# Altium PCB ledcube_v2.PcbDoc (part 17 of 18)
Units mil, origin at the board's own origin, x right, y up, seen from the top; angles counter-clockwise.
Board outline 3130 x 3300 mil, 2 copper layers (Top Layer, Bottom Layer); 188 components, 216 nets, 29515 pads, 250 vias.
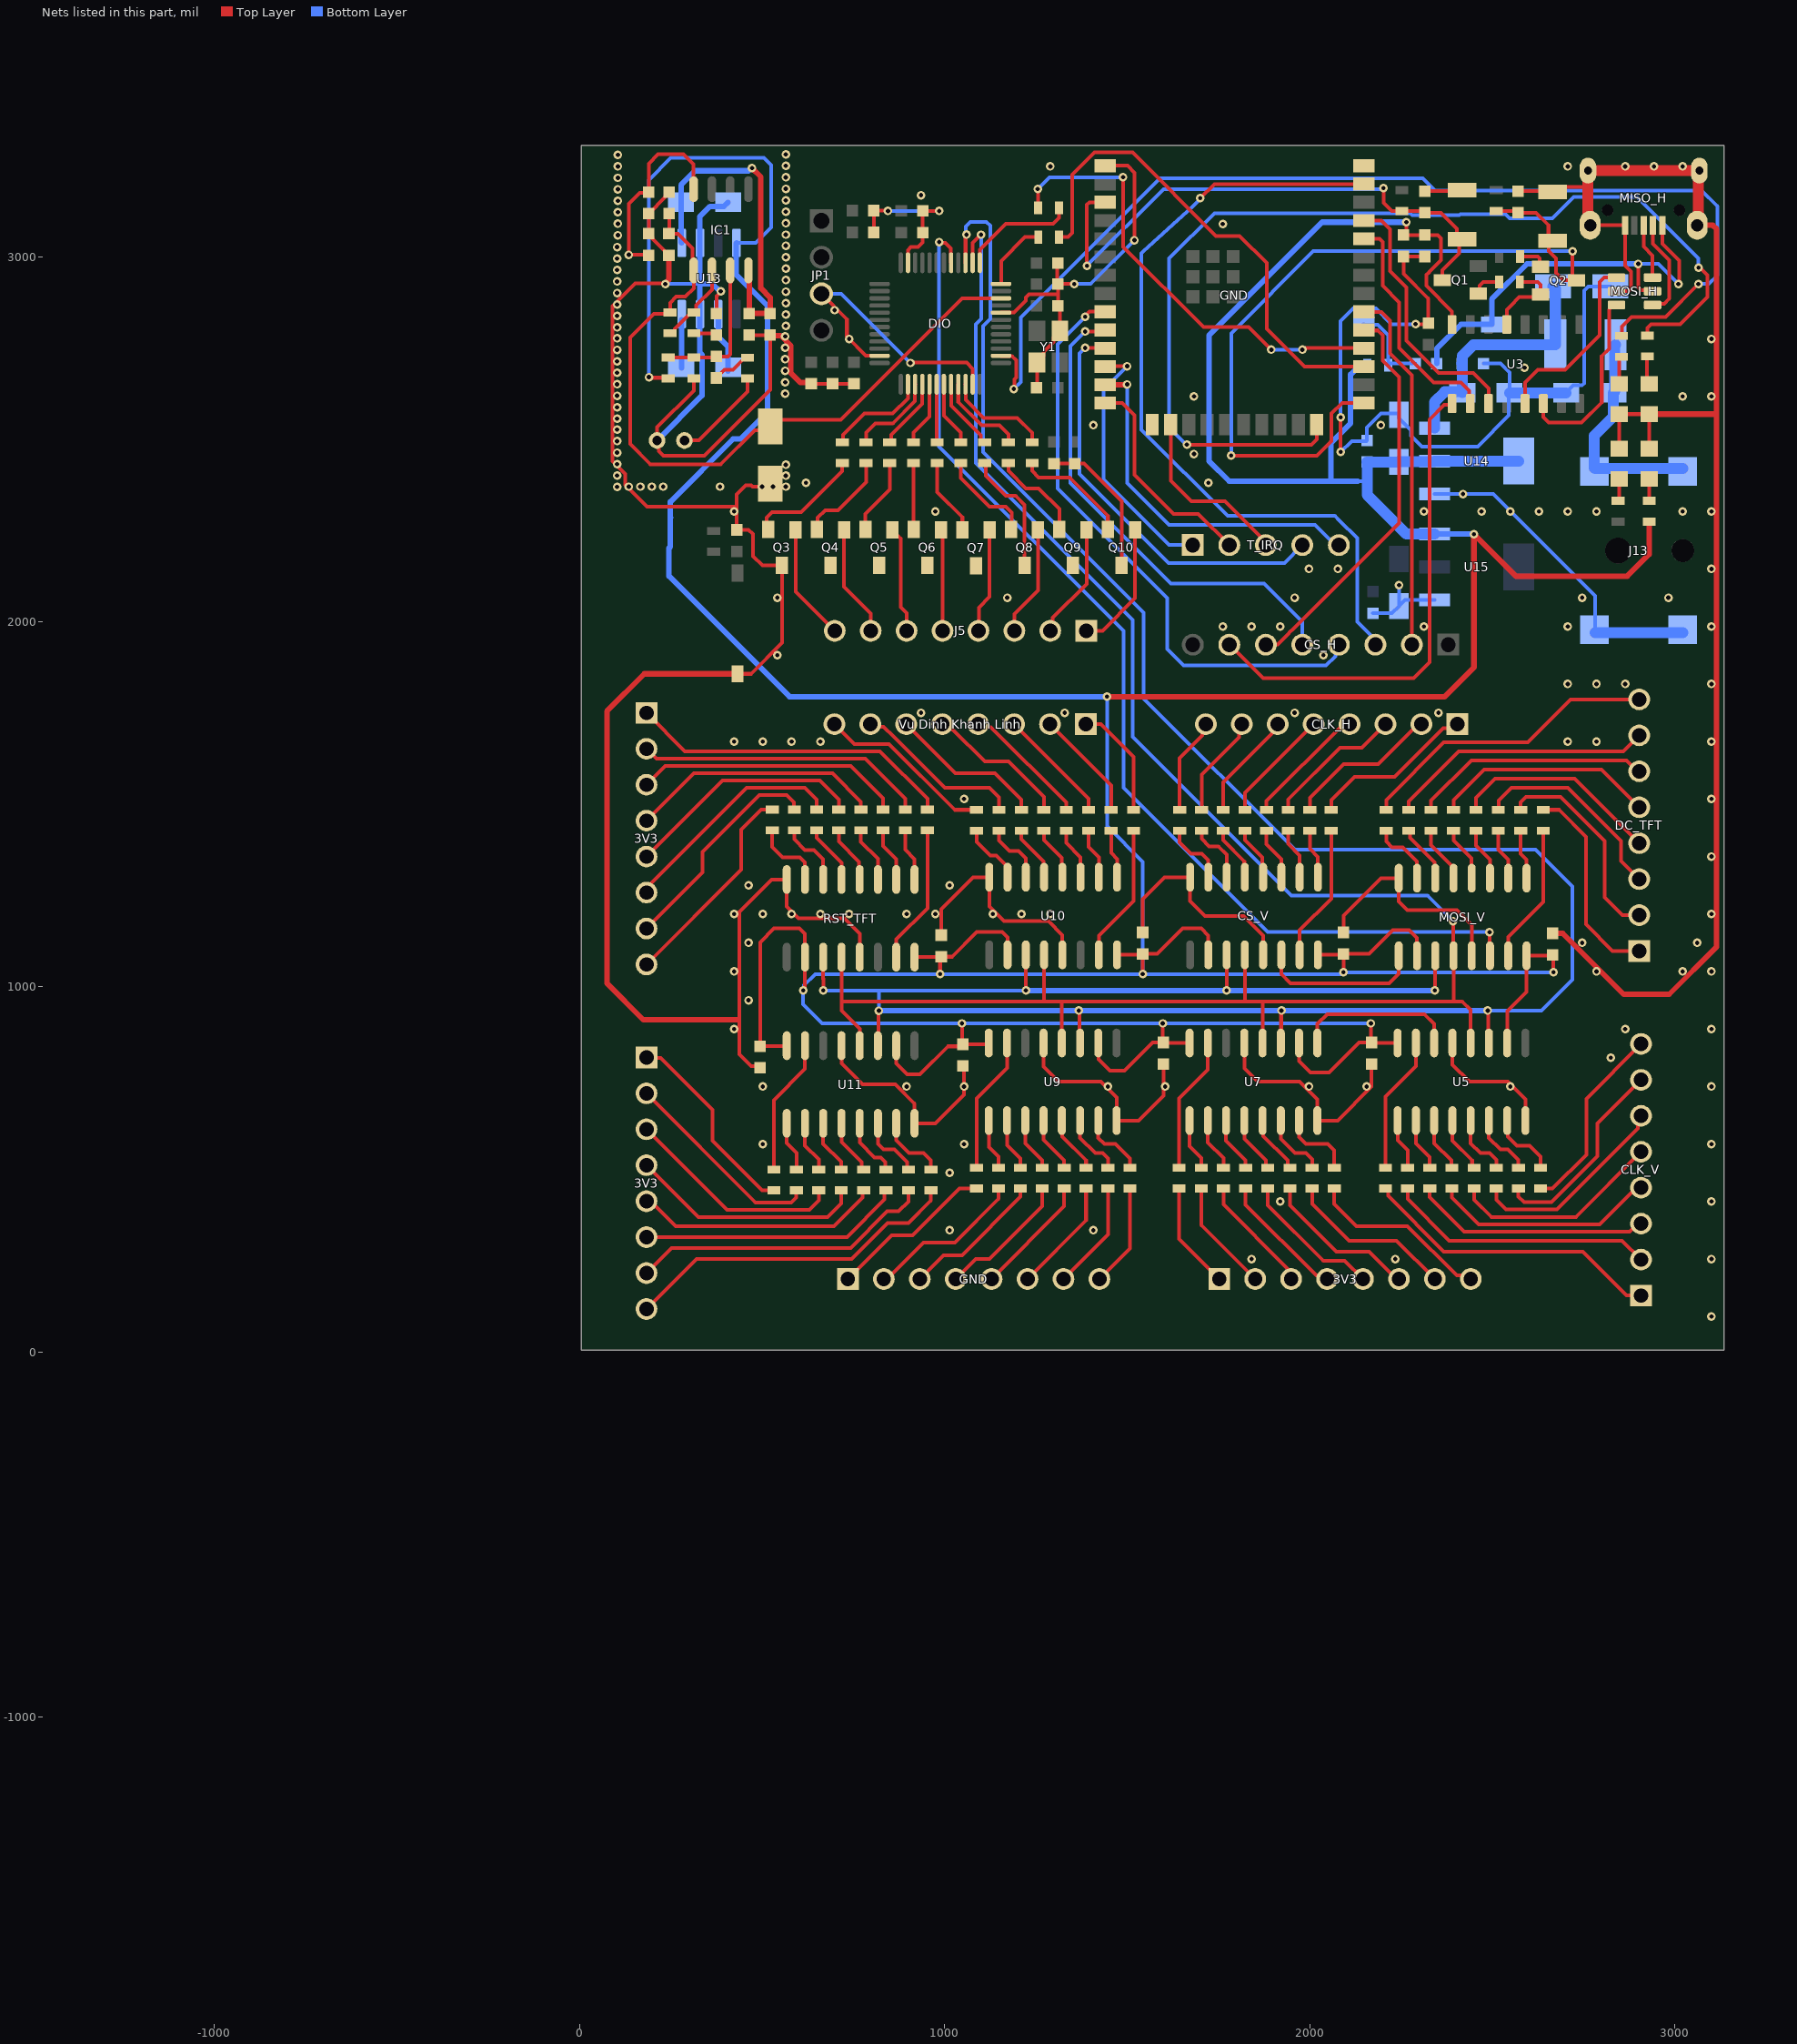
[diagram p16: the nets of this part, all layers, seen from the top]

## Via types
v1: diameter 23.62, hole 11.81, Top Layer to Bottom Layer, tented both sides, 128 vias
v2: diameter 23.62, hole 11.81, Top Layer to Bottom Layer, 122 vias

## Nets (pads, with @x,y where several pads share a name; then routed paths per layer and width w, separated by ;. In a path a pad name is that pad's centre, name@x,y a point inside that pad or via, vN(x,y) a via of type N, cw(c..) or ccw(c..) an arc to the next point about the centre after c; other vN are vias at no path point) (continued)
5V: C17.2 C18.2 C20.2 C21.2 C22.2 C23.2 C24.2 C25.2 C26.2 C27.2 C34.2 C35.2 C40.2 C42.2 CS_V.10 CS_V.16 IC1.8 MOSI_V.10 MOSI_V.16 R85.2 R88.2 R89.2 RST_TFT.10 RST_TFT.16 U3.16 U5.10 U5.16 U7.10 U7.16 U9.10 U9.16 U10.10 U10.16 U11.10 U11.16 U13.8 U14.2 U14.4 U15.3 | length 17330
  Top Layer w10: C35.2@189.72,3003.78 188.49,3005 v1(135,3005) 135,3145 164.83,3174.82 187.86,3174.82 C34.2@189.72,3176.68 189.72,3254.72 215,3280 285,3280 312.22,3252.78 312.22,3185.18 IC1.8@312.72,3184.69 ; v1(190,2670) 191.73,2668.27 241.26,2668.27 R85.2@242.98,2666.54 ; U11.16@567.56,839.21 566.11,837.76 C27.2@494.72,837.76 494.72,1122.23 532.72,1160.23 602.72,1160.23 617.56,1145.39 RST_TFT.10@617.56,1081.61 617.64,1081.53 v1@617.64,998.84 ; U11.10@867.56,839.21 867.56,790.39 897.72,760.23 932.72,760.23 1009.82,837.34 1044.3,837.34 C26.2@1049.72,842.76 ; RST_TFT.16@917.56,1081.61 C23.2@989.62,1081.61 ; v1(987.72,1035.23) 987.72,1079.7 C23.2@989.62,1081.61 ; v1@1047.72,890.23 1047.72,844.76 C26.2@1049.72,842.76 ; U9.16@1121.06,846.61 1117.21,842.76 C26.2@1049.72,842.76 ; U10.10@1172.56,1087.91 1172.56,1135.39 1157.72,1150.23 1087.72,1150.23 1020.19,1082.7 C23.2@990.72,1082.7 C23.2@989.62,1081.61 ; U9.10@1421.06,846.61 1421.23,846.44 1421.23,801.72 1452.72,770.23 1492.72,770.23 1570.24,847.76 C24.2@1599.72,847.76 ; U10.16@1472.56,1087.91 1540.4,1087.91 C22.2@1542.72,1090.23 ; v1(1542.72,1035.23) C22.2@1542.72,1090.23 ; v1@1597.72,890.23 1597.72,849.76 C24.2@1599.72,847.76 ; U7.16@1671.06,846.61 1600.86,846.61 C24.2@1599.72,847.76 ; CS_V.10@1722.56,1087.91 1722.56,1140.39 1702.72,1160.23 1652.72,1160.23 1582.72,1090.23 C22.2@1542.72,1090.23 ; U7.10@1971.06,846.61 1971.06,796.88 2002.72,765.23 2052.72,765.23 2135.24,847.76 C25.2@2169.72,847.76 2167.72,849.76 v1@2167.72,895.23 ; CS_V.16@2022.56,1087.91 2090.4,1087.91 C21.2@2092.72,1090.23 ; v1(2092.72,1040.23) C21.2@2092.72,1090.23 ; C25.2@2169.72,846.61 U5.16@2241.06,846.61 ; C18.2@2257,3059.29 C18.2@2267,3059.29 ; v1(2265,3094.26) 2265,3061.29 C18.2@2267,3059.29 ; MOSI_V.10@2294.05,1085.31 2294.05,1133.89 2272.72,1155.23 2227.54,1155.23 2162.54,1090.23 C21.2@2092.72,1090.23 ; U3.16@2390,2814.21 2390,2850 2320,2920 2320,2950 2327.01,2957.01 2327.01,2957.5 2334.55,2965.04 2335.04,2965.04 2360,2990 2360,3050 2350.71,3059.29 C17.2@2315.72,3059.29 C18.2@2267,3059.29 ; U5.10@2541.06,846.61 2541.06,933.58 2594.05,986.57 MOSI_V.16@2594.05,1085.31 2663.32,1085.31 C20.2@2665.72,1087.7 2667.72,1085.7 v1(2667.72,1040.23)
  Top Layer w15: v1(1445,1795) 2370,1795 2450,1875 v1(2450,2240) 2565,2125 2870,2125 2930,2185 R88.2@2930,2274.22
  Bottom Layer w10: v1(135,3005) 190,3005 ; v1(190,2670) 190,3005 ; U13.8@430,3037.44 482.44,3037.44 525,3080 525,3250 505,3270 250,3270 190,3210 190,3005 ; v1(1445,1795) 1445,1440.29 1542.72,1342.57 v1(1542.72,1035.23) ; 2131.37,2385 2157.75,2385 ; v1(2167.72,900.23) v1(1597.72,900.23) v1(1047.72,900.23) 664.77,900.23 612.72,952.28 v1(612.72,990.23) 615.32,992.84 615.32,1005.32 645.23,1035.23 v1(987.72,1035.23) v1(1542.72,1035.23) ; v1(2667.72,1040.23) v1(2092.72,1040.23) 2089.03,1040.23 2084.03,1035.23 v1(1542.72,1035.23)
  Bottom Layer w15: U13.8@430,3037.44 428.61,3036.05 428.61,2951.39 515,2865 515,2575 440.82,2500.82 420.82,2500.82 248.72,2328.72 248.72,2286.28 250,2285 248.72,2283.72 248.72,2205.05 245,2201.33 245,2125 575,1795 v1(1445,1795) ; 2131.37,2385 2057.82,2385 ; R89.2@2157.91,2702.55 2137.55,2702.55 2112.18,2677.19 2112.18,2543.51 2057.82,2489.14 2057.82,2385 ; v1(2265,3094.26) 2034.26,3094.26 1725,2785 1725,2439.42 1779.42,2385 2057.82,2385 ; U15.3@2341.84,2240.16 2341.92,2240.08 2449.92,2240.08 v1(2450,2240)
  Bottom Layer w30: U15.3@2341.84,2240.16 2264.84,2240.16 2157.75,2347.25 2157.75,2385 2157.75,2436.72 C42.2@2157,2437.47 2157.26,2437.74 2243.81,2437.74 C40.2@2244.08,2438 2245.08,2439 2340.84,2439 U14.2@2341.84,2440 U14.4@2572.55,2440
5V_USB: C43.1 MISO_H.1 MOSI_H.5 S2.1 | length 1151.5
  Top Layer w10: v1(2900,2980) 2900,2915.38 2907.42,2907.96 2936.45,2907.96 MOSI_H.5@2939.41,2905 ; MISO_H.1@2966.18,3085.83 2966.18,3034.67 3012.39,2988.45 3012.39,2927.39 v1(3010,2925)
  Bottom Layer w10: v1(2900,2980) 2955,2980 v1(3010,2925)
  Bottom Layer w15: C43.1@2348.26,2707.11 2348.26,2748.26 2414.42,2814.42 S2.1@2498.61,2814.42 2498.61,2883.61 2595,2980 v1(2900,2980)
9V: C39.2 C41.2 D4.2 F1.1 U14.3 | length 691.5
  Bottom Layer w30: U14.3@2341.84,2530.16 2341.84,2601.84 2370,2630 2415.53,2630 C39.2@2417.74,2627.79 ; C39.2@2418,2627.53 C39.2@2417.74,2627.79 ; D4.2@2666.26,2918.54 2673,2911.8 F1.1@2673,2758.54 2448.54,2758.54 2418.22,2728.22 2418.22,2707.86 C41.2@2417.47,2707.11 2417.74,2706.85 C39.2@2417.74,2627.79
-5V: C32.2 C33.2 C38.1 IC1.4 U13.5 | length 967.3
  Top Layer w15: IC1.4@462.72,2962.24 462.72,2936.29 464.98,2934.02 C33.2@464.98,2844.07 ; C33.2@465.98,2844.07 C32.2@522,2844.07 522,2888 496.65,2913.35 496.65,3218.13 472.5,3242.28 v1(472.5,3242.5)
  Bottom Layer w15: U13.5@280,3037.44 278,3039.44 C38.1@278,3149 278,3196.21 316.79,3235 462.67,3235 470.17,3242.5 v1(472.5,3242.5)
BOOT: DIO.44 R1.2 | length 199.7
  Top Layer w10: DIO.44@1017.85,2650.53 1017.85,2592.15 1099.12,2510.88 1099.12,2497.57 1104.95,2491.75 R1.2@1109.74,2491.75
DTR: Q2.2 R9.1 U3.13 | length 235.5
  Top Layer w10: U3.13@2540,2814.21 2540,2855 2550,2865 2574.28,2889.28 2624.89,2889.28 Q2.2@2632.05,2896.43 2632.05,2922.95 2624.77,2930.23 R9.1@2576.05,2930.23
GND: 3V3.2@2930,2473.83 5V.2 BOOT.OUT C1.1 C2.1 C3.1 C4.1 C5.1 C6.1 C7.1 C8.1 C9.1 C10.1 C11.1 C12.1 C13.1 C14.1 C15.1 C16.1 C17.1 C18.1 C19.2 C20.1 C21.1 C22.1 C23.1 C24.1 C25.1 C26.1 C27.1 C28.1 C29.1 C30.2 C32.1 C33.1 C34.1 C35.1 C36.1 C38.2 C39.1 C40.1 C41.1 C42.1 C44.1 C45.1 CLK.N CS_H.7 CS_V.8 CS_V.13 D3.1 D4.1 DIO.8 DIO.23 DIO.35 DIO.47 EN.OUT ESP32.2 GND.1@1439.84,3248.82 GND.15 GND.38 J13.2 J13.3 JP1.3 MISO_H.5 MISO_H.Shell MOSI_H.2 MOSI_V.8 MOSI_V.13 Q3.2 Q4.2 Q5.2 Q6.2 Q7.2 Q8.2 Q9.2 Q10.2 R1.1 R87.1 RESET.1 RST_TFT.8 RST_TFT.13 STM32.2 U3.1 U5.8 U5.13 U7.8 U7.13 U9.8 U9.13 U10.8 U10.13 U11.8 U11.13 U13.3 U13.6 U14.1 U15.1 Y1.2 Y1.4 | length 22885
  Top Layer w10: C35.1@189.72,3062.83 C34.1@189.72,3117.63 234.97,3162.88 234.97,3166.01 C29.1@245.72,3176.76 ; C35.1@190.54,3062.83 200.46,3052.91 200.46,3048.78 233.97,3015.28 233.97,3014.45 C28.1@243.89,3004.53 ; v1(235,2925) 232.67,2927.33 152.33,2927.33 90,2865 90,2440 125,2405 125,2375 132.5,2367.5 185,2315 430.72,2315 ; R87.1@312.98,2661.54 312.98,2632.98 212.6,2532.6 CLK.N@212.6,2496.5 217.28,2491.82 217.28,2467.72 230.08,2454.92 341.67,2454.92 522,2635.26 C32.1@522,2785.02 C33.1@464.98,2785.02 C33.1@459.98,2785.02 ; C30.2@374.98,2844.07 374.98,2892.02 386.86,2903.89 v1(386.86,2904.68) ; RESET.1@432.72,1857.44 469.92,1857.44 554.74,1942.26 Q3.2@554.74,2153.99 501.01,2153.99 475,2180 475,2240 463.24,2251.76 C3.1@430.72,2251.76 430.72,2315 ; C27.1@494.72,778.7 490.3,783.12 469.83,783.12 437.72,815.23 437.72,1205.23 526.7,1294.21 RST_TFT.8@567.56,1294.21 567.56,1220.39 600.03,1187.91 725.03,1187.91 767.56,1145.39 RST_TFT.13@767.56,1081.61 ; v1(530,2370) 474.16,2370 470.79,2373.38 455.86,2373.38 430.72,2348.23 430.72,2315 ; C10.1@634.74,2651.68 C12.1@693.24,2651.68 C11.1@751.74,2651.68 ; JP1.3@662.68,2898.2 732.38,2828.51 732.38,2780.57 784.32,2728.63 821.64,2728.63 DIO.35@821.99,2728.28 ; U11.13@717.56,839.21 717.56,790.39 775.03,732.91 865.03,732.91 917.56,680.39 U11.8@917.56,626.61 974.1,626.61 1052.72,705.23 C26.1@1052.72,787.91 ; C13.1@806.27,3066.2 C14.1@806.27,3126.2 806.78,3125.7 844.3,3125.7 v1(845,3125) ; DIO.23@899.74,2983.2 899.74,3018.2 907.56,3026.02 927.56,3026.02 940.33,3038.79 C4.1@940.33,3065.2 C5.1@940.33,3125.2 940.53,3125 v1(985,3125) ; v1(906.25,2708.75) 907.5,2710 1060,2710 1076.91,2693.09 DIO.47@1076.91,2650.53 ; Q6.2@953.31,2153.99 Q6.2@960,2147.3 ; C23.1@990.72,1141.76 990.72,1213.23 1077.99,1300.51 U10.8@1122.56,1300.51 1122.56,1220.39 1162.72,1180.23 1284.61,1180.23 1322.56,1142.28 U10.13@1322.56,1087.91 ; R1.1@1109.74,2434.66 1113.26,2431.15 1113.26,2399.69 1167.72,2345.23 1194.48,2345.23 1219.03,2320.68 Q8.2@1219.03,2153.99 ; DIO.8@1154.66,2846.39 1155.01,2846.74 1190.11,2846.74 1222.88,2879.51 1222.88,2887.88 1231.58,2896.58 1310.56,2896.58 ; C1.1@1251.43,2641.2 1253.25,2643.02 Y1.4@1253.25,2709.9 1270.88,2727.53 1270.88,2736.48 1272.72,2738.31 1272.72,2740.23 1298.6,2766.12 1298.6,2778.87 Y1.2@1316.24,2796.51 1316.24,2859.52 C2.1@1310.56,2865.2 1310.56,2896.58 ; U9.13@1271.06,846.61 1271.06,781.88 1312.63,740.31 1427.63,740.31 1471.06,696.88 U9.8@1471.06,634.01 1531.5,634.01 1599.72,702.23 C24.1@1599.72,788.7 ; C9.1@1299.74,2433.2 C8.1@1356.74,2433.2 1381.8,2433.2 1484.74,2330.26 Q10.2@1484.74,2153.99 ; C7.1@1308.89,2923.53 1308.89,2980.53 C6.1@1310.56,2982.2 ; C7.1@1310.56,2925.2 1310.56,2896.58 ; C7.1@1310.76,2925 v1(1355,2925) ; GND.1@1439.84,3248.82 1501.09,3248.82 1520,3229.91 v1(1520,3045) ; C22.1@1542.72,1149.29 1542.72,1240.23 1602.99,1300.51 CS_V.8@1672.56,1300.51 1672.56,1235.39 1713.74,1194.21 1818.74,1194.21 1872.56,1140.39 CS_V.13@1872.56,1087.91 ; CS_H.7@1780,1932.05 CS_H.7@1780,1937.3 1872.3,1845 2285,1845 2328.7,1888.7 2328.7,2553.7 2368.65,2593.65 2385.98,2593.65 U3.1@2390,2597.68 ; U7.13@1821.06,846.61 1821.06,776.88 1857.63,740.31 1972.63,740.31 2021.06,691.88 U7.8@2021.06,634.01 2076.5,634.01 2169.72,727.23 C25.1@2169.72,788.7 ; v1(2085,2465) v1(2085,2560) ; C21.1@2092.72,1149.29 2092.72,1195.23 2195.4,1297.91 MOSI_V.8@2244.05,1297.91 2244.05,1233.89 2268.03,1209.92 2402.94,1209.92 2444.05,1168.8 MOSI_V.13@2444.05,1085.31 ; v1(2290,2815) 2323.19,2815 C19.2@2325.72,2817.53 2325,2818.24 2325,2885 2257,2953 C18.1@2257,3000.23 C17.1@2315.72,3000.23 C17.1@2315.21,2999.72 ; C15.1@2325.72,3179.05 2415,3179.05 EN.OUT@2417.72,3181.76 ; U5.13@2391.06,846.61 2391.06,786.88 2437.63,740.31 2542.63,740.31 2591.06,691.88 U5.8@2591.06,634.01 ; C16.1@2570.72,3179.05 2660.97,3179.05 2672.35,3190.43 2762.44,3190.43 ; MISO_H.Shell@2765.36,3085.83 MISO_H.Shell@2768.35,3085.83 MISO_H.5@2863.82,3085.83 2863.82,2975.19 2880,2959.01 2880,2912.57 2873.55,2906.12 2841.71,2906.12 MOSI_H.2@2840.59,2905 ; 5V.2@2847.5,2473.83 STM32.2@2847.5,2568.66 ESP32.2@2930,2568.66 3V3.2@2930,2473.83
  Top Layer w15: v1(235,2925) 235,2927.33 244.72,2937.05 C28.1@244.72,3003.7 ; 430,910 175,910 75,1010 75,1755 177.44,1857.44 RESET.1@432.72,1857.44 ; C32.1@522,2785.02 523.48,2783.54 551.46,2783.54 578.37,2756.63 578.37,2681.63 605.28,2654.72 631.7,2654.72 C10.1@634.74,2651.68 ; C20.1@2665.72,1146.76 2693.24,1146.76 2860,980 2985,980 3114.63,1109.63 3114.63,2568.66 ; ESP32.2@2930,2568.66 3114.63,2568.66 ; MISO_H.Shell@3061.65,3085.83 3104.17,3085.83 3114.63,3075.37 3114.63,2568.66
  Top Layer w30: MISO_H.Shell@2768.35,3085.83 2763.16,3091.01 2763.16,3120.99 2762.44,3121.71 2762.44,3190.43 MISO_H.Shell@2762.44,3235.43 MISO_H.Shell@3067.56,3235.43 3064.64,3232.51 3064.64,3088.81 MISO_H.Shell@3061.65,3085.83
  Bottom Layer w10: v1(235,2925) 330,2925 ; JP1.3@662.68,2898.2 716.8,2898.2 v1(906.25,2708.75) ; v1(845,3125) v1(985,3125) ; v1(1355,2925) 1400,2925 v1(1520,3045) ; v1(2085,2465) 2115,2495 2155.47,2495 C42.1@2157,2496.53 2157,2532 2195,2570 2241.08,2570 C40.1@2244.08,2567 2244.08,2558 2277.13,2524.95 2277.13,2509.67 2306.79,2480 2460,2480 2545,2565 2545,2625.53 C39.1@2547,2627.53 ; v1(2085,2560) 2085,2823.21 2119.67,2857.87 2181.55,2857.87 2224.43,2815 v1(2290,2815) ; C45.1@2173.49,2023.47 2225.35,2023.47 C44.1@2244.88,2043 C44.1@2245,2043.12 ; v1(2245,2100) C44.1@2245,2043.12 ; U15.1@2341.84,2059.84 2261.72,2059.84 C44.1@2245,2043.12 ; U14.1@2341.84,2349.84 2342,2350 v1(2420,2350) 2503.21,2350 2782.01,2071.2 2782.01,1971.18 J13.3@2782.01,1970.59 ; C41.1@2476.53,2707.11 2522.89,2707.11 2547.4,2682.6 C39.1@2547.4,2627.53 ; C36.1@2702.6,2627.13 2722.65,2647.17 2746.27,2647.17 2752.13,2653.03 2752.13,2907.13 2763.54,2918.54 D4.1@2823.74,2918.54
  Bottom Layer w15: CLK.N@212.6,2496.5 335.37,2619.27 335.37,2731.37 330,2736.74 U13.3@330,2842.56 330,2925 ; v1(386.86,2904.68) 384.53,2904.68 364.21,2925 330,2925 ; C38.2@407,3149 395.54,3137.54 357.54,3137.54 330,3110 U13.6@330,3037.44 330,2925
  Bottom Layer w30: C39.1@2547.4,2627.13 C36.1@2702.6,2627.13 ; J13.3@2782.01,1970.59 J13.2@3022.17,1970.59
  other v1: 102.83,2369.04 135,2370 166.43,2370 197.86,2370 229.29,2370 385,2370 500,2370 565,2370 102.83,2400.47 565,2400 565,2430 102.83,2431.9 102.83,2463.33 102.83,2494.76 102.83,2526.18 102.83,2556.18 102.83,2587.61 102.83,2619.04 563.37,2624.49 102.83,2650.47 563.37,2655.91 102.83,2681.9 563.37,2687.34 102.83,2713.33 563.37,2718.77 102.83,2744.76 563.37,2750.2 102.83,2776.18 563.37,2781.63 102.83,2806.18 565,2810 102.83,2837.61 565,2841.43 102.83,2869.04 565,2872.86 102.83,2900.47 565,2904.29 102.83,2931.9 565,2935.71 102.83,2963.33 565,2967.14 102.83,2994.76 565,2998.57 102.83,3026.18 565,3030 105,3058.57 565,3060 105,3090 565,3091.43 105,3121.43 565,3122.86 105,3152.86 565,3154.29 105,3184.29 565,3185.71 105,3215.71 565,3217.14 105,3247.14 565,3248.57 105,3278.57 565,3280
  other v2: 3100.65,97.37 1840.81,254.85 2234.51,254.85 3100.65,254.85 1014.03,333.59 1407.74,333.59 1919.55,412.33 3100.65,412.33 1014.03,491.07 502.22,569.81 1053.4,569.81 3100.65,569.81 502.22,727.29 895.92,727.29 1053.4,727.29 1447.11,727.29 1604.59,727.29 1998.29,727.29 2155.77,727.29 2549.47,727.29 3100.65,727.29 2825.06,806.03 423.48,884.77 2864.43,884.77 3100.65,884.77 462.85,963.51 423.48,1042.25 2785.69,1042.25 3021.91,1042.25 3100.65,1042.25 462.85,1120.99 2746.32,1120.99 3061.28,1120.99 423.48,1199.73 502.22,1199.73 580.96,1199.73 659.7,1199.73 738.44,1199.73 895.92,1199.73 974.66,1199.73 1132.14,1199.73 1210.88,1199.73 1289.62,1199.73 3100.65,1199.73 462.85,1278.47 1014.03,1278.47 3100.65,1357.21 1053.4,1514.69 3100.65,1514.69 423.48,1672.17 502.22,1672.17 580.96,1672.17 659.7,1672.17 2706.95,1672.17 2785.69,1672.17 3100.65,1672.17 935.29,1750.91 1328.99,1750.91 1958.92,1750.91 2352.62,1750.91 2706.95,1829.65 2785.69,1829.65 2864.43,1829.65 3100.65,1829.65 541.59,1908.39 2037.66,1908.39 1762.07,1987.13 1840.81,1987.13 1919.55,1987.13 2313.25,1987.13 2706.95,1987.13 3100.65,1987.13 541.59,2065.87 1171.51,2065.87 1958.92,2065.87 2746.32,2065.87 2982.54,2065.87 1998.29,2144.61 2077.03,2144.61 3100.65,2144.61 423.48,2302.09 974.66,2302.09 2313.25,2302.09 2470.73,2302.09 2549.47,2302.09 2628.21,2302.09 2706.95,2302.09 2785.69,2302.09 3021.91,2302.09 3100.65,2302.09 620.33,2380.83 1722.7,2380.83 1683.33,2459.57 1407.74,2538.31 2195.14,2538.31 1683.33,2617.05 3021.91,2617.05 3100.65,2617.05 2588.84,2695.79 738.44,2774.53 3100.65,2774.53 699.07,2853.27 1762.07,3089.49 935.29,3168.23 1289.62,3246.97 2706.95,3246.97 2864.43,3246.97 2943.17,3246.97 3021.91,3246.97
LED_STATUS: GND.24 R4.1 | length 2855.9
  Top Layer w10: v1@1663.86,2485 2005,2485 2019.58,2499.58 GND.24@2019.58,2520.6 ; R4.1@2925,2783.54 2925,2805 2935,2815 3014.9,2815 3089.56,2889.66 3089.56,2948.57 3068.13,2970 v1(3065,2970)
  Bottom Layer w10: v1(1663.55,2485) 1662.07,2485 1615,2532.07 1615,2995 1739.07,3119.07 2275.28,3119.07 2281.07,3113.28 2410.09,3113.28 2413.18,3116.38 2536.85,3116.38 2548.23,3105 2665,3105 2723.35,3163.35 2896.65,3163.35 2978.9,3081.1 3065,2995 v1(3065,2970)
LEDTEST_STM32: DIO.2 R3.1 | length 2966
  Top Layer w10: DIO.2@1154.66,2728.28 1155.01,2727.94 1184.52,2727.94 1196.08,2716.38 1196.08,2669.42 1191.08,2664.42 1191.08,2639.34 v1(1189.35,2637.6) ; R3.1@2854.44,2782.62 2855,2783.18 2855,2808.45 2881.55,2835 2975,2835 3064.87,2924.87 v1(3064.87,2925)
  Bottom Layer w10: v1(1189.35,2637.6) 1208.37,2656.62 1208.37,2833.37 1590,3215 2310,3215 2343.78,3181.22 3073.78,3181.22 3117.13,3137.87 3117.13,2948.54 3093.59,2925 v1(3064.87,2925)
NetB1_IN: C15.2 EN.IN GND.3@1439.84,3148.82 Q1.3 R7.1 | length 1555.2
  Top Layer w10: v1(1390,2975) 1390,3142.46 1396.36,3148.82 GND.3@1439.84,3148.82 ; v1(2202.39,3187.39) 2202.39,3147.61 2225.1,3124.9 R7.1@2252.72,3124.9 ; R7.1@2257.62,3124.9 2310.81,3124.9 C15.2@2315.72,3119.99 2360.01,3119.99 2403.27,3076.73 2403.27,3062.34 EN.IN@2417.72,3047.9 2410,3040.19 2410,3009.54 2363.5,2963.04 Q1.3@2363.5,2935.43
  Bottom Layer w10: v1(1390,2975) 1600,3185 2192.33,3185 2194.72,3187.39 v1(2202.39,3187.39)
NetB2_IN: BOOT.IN C16.2 GND.25 Q2.3 R8.1 | length 2303.2
  Top Layer w10: v1(1785,2455) 2020,2455 2060,2495 2060,2569.91 2088.91,2598.82 GND.25@2168.27,2598.82 ; R8.1@2511.07,3124.9 2565.81,3124.9 C16.2@2570.72,3119.99 2620.01,3119.99 2654.26,3085.74 2654.26,3056.6 BOOT.IN@2662.96,3047.9 ; BOOT.IN@2663.68,3047.9 2655,3039.22 2655,3015 2675,2995 2675,2955 2694.97,2935.03 Q2.3@2730.47,2935.03 2720,2945.5 v1(2720,3014.69)
  Bottom Layer w10: v1(1785,2455) 1785,2790 2009.68,3014.69 v1(2720,3014.69)
NetC28_2: C28.2 C29.2 D3.2 DIO.10 IC1.1 R83.2 | length 2012.5
  Top Layer w10: C29.2@245.72,3117.7 245.72,3063.76 C28.2@244.72,3062.76 270.19,3062.76 310.11,3022.84 310.11,2964.85 IC1.1@312.72,2962.24 312.72,2912.72 290.09,2890.09 265.16,2890.09 247.98,2872.91 R83.2@247.98,2847.09 244.61,2843.71 203.71,2843.71 138.38,2778.38 138.38,2486.62 193.38,2431.62 386.62,2431.62 480.02,2525.02 512.65,2525.02 540.31,2552.68 715.27,2552.68 1048.35,2885.76 DIO.10@1154.66,2885.76
NetC30_1: C30.1 R84.1 | length 64.1
  Top Layer w10: R84.1@312.98,2790 370,2790 C30.1@374.98,2785.02
NetC31_1: C31.1 IC1.3 R85.1 R87.2 | length 438.7
  Top Layer w10: R85.1@242.98,2723.5 C31.1@374.98,2723.5 ; C31.1@374.98,2726.61 407.13,2726.61 412.98,2732.47 IC1.3@412.98,2927.99 ; IC1.3@412.72,2927.72 IC1.3@412.98,2927.99 ; IC1.3@412.72,2962.24 IC1.3@412.98,2961.98 ; IC1.3@412.98,2962.24 IC1.3@412.98,2961.98 ; IC1.3@412.98,2927.99 415.11,2930.11 415.11,2959.85 IC1.3@412.98,2961.98 ; IC1.3@412.98,2927.99 IC1.3@412.98,2961.98
NetC31_2: C31.2 R86.2 | length 108.4
  Top Layer w10: C31.2@374.98,2667.56 397.28,2689.86 419.84,2689.86 R86.2@453.38,2723.4 ; R86.2@453.38,2718.4 R86.2@460.27,2718.4
NetC36_2: C36.2 F1.0 J13.1 | length 604.3
  Bottom Layer w30: F1.0@2838.41,2758.54 2835.2,2755.33 2835.2,2629.93 C36.2@2832,2626.73 2832,2562 2780,2510 2780,2421.42 2782.01,2419.41 J13.1@3022.17,2419.41
NetC37_1: C37.1 U13.4 | length 131
  Bottom Layer w15: C37.1@280,2695.47 U13.4@280,2826.51
NetC37_2: C37.2 U13.2 | length 167.4
  Bottom Layer w15: U13.2@380,2842.56 380,2780 407.27,2752.73 C37.2@407.27,2697.17 C37.2@407.27,2686.44
NetC43_2: C43.2 R89.1 S2.2 | length 232.9
  Bottom Layer w10: S2.2@2148.22,2814.42 2149.53,2813.11 2186.89,2813.11 2215,2785 R89.1@2215,2707.11 ; R89.1@2215,2702.55 2219.56,2707.11 C43.2@2289.2,2707.11
NetD1_1: R3.2 STM32.1 | length 77.7
  Top Layer w10: STM32.1@2847.5,2651.34 2847.5,2719.71 2853.33,2725.53 R3.2@2854.44,2725.53
NetD2_1: ESP32.1 R4.2 | length 77.5
  Top Layer w10: R4.2@2924.17,2726.46 2924.17,2657.17 ESP32.1@2930,2651.34
NetD5_1: 3V3.1@2930,2391.15 R88.1 | length 59.8
  Top Layer w10: R88.1@2930,2331.31 3V3.1@2930,2391.15
NetD6_1: 5V.1 R90.1 | length 64.4
  Top Layer w10: R90.1@2845,2331.31 2847.5,2333.81 5V.1@2847.5,2391.15
  Top Layer w15: 5V.1@2845,2388.65 5V.1@2847.5,2391.15
NetIC1_2: IC1.2 R83.1 R84.2 | length 228.5
  Top Layer w10: R83.1@247.98,2790 254.87,2790 260.7,2795.83 260.7,2801.69 306.09,2847.09 314.13,2847.09 319.95,2852.91 319.95,2867.06 362.72,2909.82 IC1.2@362.72,2962.24
NetJ1_2: MISO_H.2 MOSI_H.4 | length 272
  Top Layer w10: MOSI_H.4@2939.41,2867.6 2942.79,2870.98 2970.98,2870.98 2985,2885 2985,2990.57 2940.59,3034.98 MISO_H.2@2940.59,3085.83
NetJ1_3: MISO_H.3 MOSI_H.6 | length 153.5
  Top Layer w10: MISO_H.3@2915,3085.83 2915,3027.44 2939.41,3003.03 MOSI_H.6@2939.41,2942.4
NetJ2_2: CS_H.2 GND.30 | length 993.9
  Top Layer w10: GND.30@2148.5,2848.82 2196.18,2848.82 2220,2825 2220,2735 2280,2675 CS_H.2@2280,1937.3
NetJ2_3: CS_H.3 GND.37 | length 2215.1
  Top Layer w10: v1(1700,3160) 1738.82,3198.82 GND.37@2168.27,3198.82
  Bottom Layer w10: v1(1700,3160) 1700,3157.33 1684.99,3142.32 1678.56,3136.46 1545.07,3015.07 1539.21,3009.21 1539.21,3005.06 1539.21,2525.79 1775,2290 2068.87,2290 2082.14,2276.74 2130,2228.87 2130,2000 2180,1950 CS_H.3@2180,1937.3
NetJ2_4: CS_H.4 GND.9 | length 1653.5
  Top Layer w10: v1(1385,2835) 1385,2837.85 1397.15,2850 GND.9@1439.84,2850
  Bottom Layer w10: v1(1385,2835) 1384.91,2835 1310,2760.09 1310,2365 1610,2065 1610,1925 1655,1880 2045,1880 2070.46,1905.46 2070.46,1927.76 CS_H.4@2080,1937.3
NetJ2_5: CS_H.5 GND.10 | length 1342.5
  Top Layer w10: v1@1385.6,2795 1436.02,2795 GND.10@1439.84,2798.82
  Bottom Layer w10: v1(1385,2795) 1345,2755 1345,2380 1620,2105 1875,2105 1980,2000 CS_H.5@1980,1937.3
NetJ2_6: CS_H.6 GND.29 | length 1098.3
  Top Layer w10: CS_H.6@1880,1937.3 1912.3,1937.3 1939.82,1964.82 cw(c1980,1937.3) 1952.47,1977.47 2245,2270 2245,2670 2200,2715 2200,2785 2187.17,2797.83 2144.96,2797.83 GND.29@2143.97,2798.82
NetJ3_1: CLK_V.1 R12.2 | length 829.8
  Top Layer w10: R12.2@2207.56,447.91 2209.02,447.91 2214.85,442.09 2214.85,427.94 2367.56,275.23 2747.72,275.23 2867.97,154.98 CLK_V.1@2907.72,154.98
NetJ3_2: CLK_V.2 R14.2 | length 736.6
  Top Layer w10: R14.2@2268.27,447.91 2268.27,419.67 2382.72,305.23 2855.88,305.23 CLK_V.2@2907.72,253.4
NetJ3_3: CLK_V.3 R16.2 | length 650.4
  Top Layer w10: R16.2@2328.99,447.91 2328.99,423.96 2422.72,330.23 2877.17,330.23 2898.77,351.83 CLK_V.3@2907.72,351.83
NetJ3_4: CLK_V.4 R18.2 | length 614.4
  Top Layer w10: R18.2@2389.7,447.91 2389.7,423.25 2462.72,350.23 2794.83,350.23 2894.85,450.25 CLK_V.4@2907.72,450.25
NetJ3_5: CLK_V.5 R20.2 | length 581.2
  Top Layer w10: R20.2@2450.41,447.91 2450.41,417.53 2497.72,370.23 2729.27,370.23 CLK_V.5@2907.72,548.68
NetJ3_6: CLK_V.6 R22.2 | length 560.8
  Top Layer w10: R22.2@2511.13,447.91 2511.13,416.82 2537.72,390.23 2677.72,390.23 2899.55,612.07 2899.55,638.94 CLK_V.6@2907.72,647.1
NetJ3_7: CLK_V.7 R24.2 | length 556
  Top Layer w10: R24.2@2571.84,447.91 2571.84,426.1 2587.72,410.23 2662.72,410.23 2788.77,536.29 2788.77,626.58 CLK_V.7@2907.72,745.53
NetJ3_8: CLK_V.8 R26.2 | length 529.3
  Top Layer w10: R26.2@2632.56,447.91 2665.4,447.91 2757.72,540.23 2757.72,693.95 CLK_V.8@2907.72,843.95
NetJ4_1: DC_TFT.1 R13.2 | length 563.7
  Top Layer w10: R13.2@2639.7,1485 2682.95,1485 2756.72,1411.22 2756.72,1171.22 2829.55,1098.4 DC_TFT.1@2902.72,1098.4
NetJ4_2: DC_TFT.2 R15.2 | length 576
  Top Layer w10: R15.2@2578.27,1485 2578.27,1505.79 2592.72,1520.23 2687.72,1520.23 2807.72,1400.23 2807.72,1245.23 2856.12,1196.83 DC_TFT.2@2902.72,1196.83
NetJ4_3: DC_TFT.3 R17.2 | length 560.8
  Top Layer w10: R17.2@2516.84,1485 2517.45,1485.61 2517.45,1509.97 2552.72,1545.23 2707.72,1545.23 2852.73,1400.21 2852.73,1345.23 DC_TFT.3@2902.72,1295.25
NetJ4_4: DC_TFT.4 R19.2 | length 575
  Top Layer w10: R19.2@2455.41,1485 2455.41,1517.93 2507.72,1570.23 2726.16,1570.23 DC_TFT.4@2902.72,1393.68
NetJ4_5: DC_TFT.5 R21.2 | length 612.6
  Top Layer w10: R21.2@2393.99,1485 2393.99,1511.5 2477.72,1595.23 2799.59,1595.23 DC_TFT.5@2902.72,1492.1
NetJ4_6: DC_TFT.6 R23.2 | length 653.2
  Top Layer w10: R23.2@2332.56,1485 2332.56,1510.07 2442.72,1620.23 2867.51,1620.23 2897.21,1590.53 DC_TFT.6@2902.72,1590.53
NetJ4_7: DC_TFT.7 R25.2 | length 729.9
  Top Layer w10: R25.2@2271.13,1485 2271.13,1508.65 2407.72,1645.23 2858.99,1645.23 DC_TFT.7@2902.72,1688.95
NetJ4_8: DC_TFT.8 R27.2 | length 834.2
  Top Layer w10: R27.2@2209.7,1485 2209.7,1512.22 2367.72,1670.23 2597.72,1670.23 2714.86,1787.38 DC_TFT.8@2902.72,1787.38
NetJ5_1: J5.1 Q10.1 | length 358.6
  Top Layer w10: J5.1@1387.99,1975.23 1432.72,1975.23 1521.74,2064.26 Q10.1@1521.74,2252.2
NetJ5_2: J5.2 Q9.1 | length 318.1
  Top Layer w10: J5.2@1289.57,1975.23 1296.5,1982.16 1296.5,2011.5 1388.89,2103.89 Q9.1@1388.89,2252.2
NetJ5_3: J5.3 Q8.1 | length 303.8
  Top Layer w10: J5.3@1191.14,1975.23 1191.14,2021.14 1256.03,2086.03 Q8.1@1256.03,2252.2
NetJ5_4: J5.4 Q7.1 | length 288.8
  Top Layer w10: J5.4@1092.72,1975.23 1094.06,1976.57 1094.06,2039.06 1123.17,2068.17 Q7.1@1123.17,2251.42
NetJ5_5: J5.5 Q6.1 | length 278.6
  Top Layer w10: Q6.1@990.31,2252.2 994.29,2248.23 J5.5@994.29,1975.23
NetJ5_6: J5.6 Q5.1 | length 295.8
  Top Layer w10: Q5.1@857.46,2252.2 857.46,2245.31 869.19,2233.58 874.14,2233.58 880,2227.72 880,2040 895.86,2024.14 J5.6@895.86,1975.23
NetJ5_7: J5.7 Q4.1 | length 307.1
  Top Layer w10: Q4.1@724.6,2252.2 724.6,2095.4 797.44,2022.56 J5.7@797.44,1975.23
NetJ5_8: J5.8 Q3.1 | length 321.4
  Top Layer w10: Q3.1@591.74,2252.2 591.74,2082.5 J5.8@699.01,1975.23
NetJ6_1: 3V3.1@1752.46,200.23 R29.2 | length 293.2
  Top Layer w10: R29.2@1642.56,447.91 1642.56,310.13 3V3.1@1752.46,200.23
NetJ6_2: 3V3.2@1850.88,200.23 R32.2 | length 308.8
  Top Layer w10: R32.2@1703.27,447.91 1703.27,347.84 3V3.2@1850.88,200.23
NetJ6_3: 3V3.3@1949.31,200.23 R34.2 | length 324.4
  Top Layer w10: R34.2@1763.99,447.91 1763.99,403.96 1939.86,228.08 1939.86,209.68 3V3.3@1949.31,200.23
NetJ6_4: 3V3.4@2047.73,200.23 R36.2 | length 351.8
  Top Layer w10: R36.2@1824.7,447.91 1824.7,403.25 2018.27,209.68 2038.29,209.68 3V3.4@2047.73,200.23
NetJ6_5: 3V3.5@2146.16,200.23 R38.2 | length 389.9
  Top Layer w10: R38.2@1885.41,447.91 1885.41,402.53 2037.72,250.23 2096.16,250.23 3V3.5@2146.16,200.23
NetJ6_6: 3V3.6@2244.59,200.23 R40.2 | length 428.1
  Top Layer w10: R40.2@1946.13,447.91 1946.13,401.82 2072.72,275.23 2162.37,275.23 2237.37,200.23 3V3.6@2244.59,200.23
NetJ6_7: 3V3.7@2343.01,200.23 R42.2 | length 463.3
  Top Layer w10: R42.2@2006.84,447.91 2006.84,406.1 2107.72,305.23 2238.01,305.23 3V3.7@2343.01,200.23
NetJ6_8: 3V3.8@2441.44,200.23 R44.2 | length 501.4
  Top Layer w10: R44.2@2067.56,447.91 2067.56,405.39 2127.72,345.23 2267.72,345.23 2403.27,209.68 2431.99,209.68 3V3.8@2441.44,200.23
NetJ7_1: CLK_H.1 R30.2 | length 458.3
  Top Layer w10: R30.2@2058.99,1485 2058.99,1511.5 2122.72,1575.23 2232.72,1575.23 2365.74,1708.25 2393.26,1708.25 CLK_H.1@2404.57,1719.56
NetJ7_2: CLK_H.2 R33.2 | length 422.2
  Top Layer w10: R33.2@2000.41,1485 2000.41,1517.93 2092.72,1610.23 2187.72,1610.23 2297.05,1719.56 CLK_H.2@2306.14,1719.56
NetJ7_3: CLK_H.3 R35.2 | length 380.5
  Top Layer w10: R35.2@1941.13,1485 1941.13,1513.65 2082.78,1655.29 2143.45,1655.29 CLK_H.3@2207.72,1719.56
NetJ7_4: CLK_H.4 R37.2 | length 338.9
  Top Layer w10: R37.2@1881.84,1485 1881.84,1509.36 2082.6,1710.12 2099.84,1710.12 CLK_H.4@2109.29,1719.56
NetJ7_5: CLK_H.5 R39.2 | length 312.6
  Top Layer w10: R39.2@1822.56,1485 1822.56,1531.26 CLK_H.5@2010.86,1719.56
NetJ7_6: CLK_H.6 R41.2 | length 296.4
  Top Layer w10: R41.2@1763.27,1485 1763.27,1560.79 1912.44,1709.96 CLK_H.6@1912.44,1719.56
NetJ7_7: CLK_H.7 R43.2 | length 280.1
  Top Layer w10: R43.2@1703.99,1485 1703.99,1581.5 1806.43,1683.95 1806.43,1711.98 CLK_H.7@1814.01,1719.56
NetJ7_8: CLK_H.8 R45.2 | length 264.2
  Top Layer w10: R45.2@1643.99,1485 1643.99,1626.5 1706.14,1688.66 1706.14,1710.12 CLK_H.8@1715.59,1719.56
NetJ8_1: GND.1@735.1,200.23 R47.2 | length 455.1
  Top Layer w10: GND.1@735.1,200.23 855.1,320.23 912.72,320.23 1040.4,447.91 R47.2@1087.56,447.91
NetJ8_2: GND.2@833.52,200.23 R49.2 | length 432.9
  Top Layer w10: GND.2@833.52,200.23 842.72,200.23 942.72,300.23 1027.72,300.23 1147.56,420.07 R49.2@1147.56,447.91
NetJ8_3: GND.3@931.95,200.23 R52.2 | length 391.6
  Top Layer w10: GND.3@931.95,200.23 996.95,265.23 1047.72,265.23 1207.56,425.07 R52.2@1207.56,447.91
NetJ8_4: GND.4@1030.37,200.23 R54.2 | length 367.8
  Top Layer w10: GND.4@1030.37,200.23 1085.37,255.23 1122.72,255.23 1267.56,400.07 R54.2@1267.56,447.91
NetJ8_5: GND.5@1128.8,200.23 R56.2 | length 330
  Top Layer w10: GND.5@1128.8,200.23 1327.56,398.99 R56.2@1327.56,447.91
NetJ8_6: GND.6@1227.22,200.23 R58.2 | length 314.1
  Top Layer w10: GND.6@1227.22,200.23 1387.56,360.57 R58.2@1387.56,447.91
NetJ8_7: GND.7@1325.65,200.23 R60.2 | length 298.2
  Top Layer w10: GND.7@1325.65,200.23 1447.56,322.14 R60.2@1447.56,447.91
NetJ8_8: GND.8@1424.07,200.23 R62.2 | length 282.3
  Top Layer w10: GND.8@1424.07,200.23 1507.56,283.72 R62.2@1507.56,447.91
NetJ9_1: "Vu Dinh Khanh Linh.1" R48.2 | length 312.7
  Top Layer w10: 1387.2,1719.56 1428.38,1719.56 1517.56,1630.39 R48.2@1517.56,1485
NetJ9_2: "Vu Dinh Khanh Linh.2" R50.2 | length 303.9
  Top Layer w10: 1288.78,1719.56 1456.13,1552.21 R50.2@1456.13,1485
NetJ9_3: "Vu Dinh Khanh Linh.3" R53.2 | length 319.2
  Top Layer w10: 1190.35,1719.56 1394.7,1515.21 R53.2@1394.7,1485
NetJ9_4: "Vu Dinh Khanh Linh.4" R55.2 | length 350
  Top Layer w10: 1091.93,1719.56 1100.3,1711.19 1126.75,1711.19 1332.98,1504.97 1332.98,1485.29 R55.2@1333.27,1485
NetJ9_5: "Vu Dinh Khanh Linh.5" R57.2 | length 396.6
  Top Layer w10: 993.5,1719.56 1006.86,1719.56 1021.02,1705.41 1022.54,1705.41 1110.72,1617.23 1175.72,1617.23 1271.84,1521.1 R57.2@1271.84,1485
NetJ9_6: "Vu Dinh Khanh Linh.6" R59.2 | length 428.6
  Top Layer w10: 895.08,1719.56 1029.41,1585.23 1137.72,1585.23 1210.41,1512.53 R59.2@1210.41,1485
NetJ9_7: "Vu Dinh Khanh Linh.7" R61.2 | length 469.4
  Top Layer w10: 796.65,1719.56 803.31,1712.91 833.19,1712.91 860.81,1685.29 1000.87,1545.23 1122.72,1545.23 1148.99,1518.96 R61.2@1148.99,1485
NetJ9_8: "Vu Dinh Khanh Linh.8" R63.2 | length 486.5
  Top Layer w10: 698.23,1719.56 752.56,1665.23 847.72,1665.23 1027.95,1485 R63.2@1087.56,1485
NetJ10_1: 3V3.1@183.38,807.08 R65.2 | length 549.8
  Top Layer w10: 3V3.1@183.38,807.08 184.73,805.74 222.21,805.74 363.96,663.99 363.96,578.99 500.03,442.91 R65.2@532.56,442.91
NetJ10_2: 3V3.2@183.38,708.66 R67.2 | length 559
  Top Layer w10: 3V3.2@183.38,708.66 482.04,410 580,410 592.94,422.94 592.94,441.87 R67.2@593.99,442.91
NetJ10_3: 3V3.3@183.38,610.23 R69.2 | length 601.3
  Top Layer w10: 3V3.3@183.38,610.23 403.62,390 630,390 655.42,415.42 R69.2@655.42,442.91
NetJ10_4: 3V3.4@183.38,511.81 R72.2 | length 643.5
  Top Layer w10: 3V3.4@183.38,511.81 325.19,370 680,370 716.84,406.84 R72.2@716.84,442.91
NetJ10_5: 3V3.5@183.38,413.38 R74.2 | length 673.8
  Top Layer w10: 3V3.5@183.38,413.38 195.12,413.38 263.5,345 697.48,345 775.43,422.94 775.43,440.07 R74.2@778.27,442.91
NetJ10_6: 3V3.6@183.38,314.96 R76.2 | length 721.4
  Top Layer w10: 3V3.6@183.38,314.96 732.44,314.96 835.43,417.94 835.43,438.64 R76.2@839.7,442.91
NetJ10_7: 3V3.7@183.38,216.53 R78.2 | length 829.4
  Top Layer w10: 3V3.7@183.38,216.53 251.85,285 742.48,285 842.72,385.23 873.95,385.23 901.13,412.42 R78.2@901.13,442.91
NetJ10_8: 3V3.8@183.38,118.11 R80.2 | length 930
  Top Layer w10: 3V3.8@183.38,118.11 320.28,255 745.06,255 843.47,353.41 900.9,353.41 962.56,415.07 R80.2@962.56,442.91
NetJ11_1: 3V3.1@183.38,1750.51 R66.2 | length 896.3
  Top Layer w10: 3V3.1@183.38,1750.51 288.66,1645.23 822.72,1645.23 952.93,1515.02 R66.2@952.93,1485.84
NetJ11_2: 3V3.2@183.38,1652.08 R68.2 | length 795.2
  Top Layer w10: 3V3.2@183.38,1652.08 184.59,1652.08 211.44,1625.23 782.72,1625.23 892.22,1515.73 R68.2@892.22,1485.84
NetJ11_3: 3V3.3@183.38,1553.66 R70.2 | length 736.9
  Top Layer w10: 3V3.3@183.38,1553.66 234.96,1605.23 742.72,1605.23 831.5,1516.44 R70.2@831.5,1485.84
NetJ11_4: 3V3.4@183.38,1455.23 R73.2 | length 694.9
  Top Layer w10: 3V3.4@183.38,1455.23 313.38,1585.23 692.72,1585.23 770.79,1507.16 R73.2@770.79,1485.84
NetJ11_5: 3V3.5@183.38,1356.81 R75.2 | length 661.7
  Top Layer w10: 3V3.5@183.38,1356.81 391.81,1565.23 657.72,1565.23 710.07,1512.87 R75.2@710.07,1485.84
NetJ11_6: 3V3.6@183.38,1258.38 R77.2 | length 633
  Top Layer w10: 3V3.6@183.38,1258.38 183.38,1270.9 457.72,1545.23 617.72,1545.23 649.36,1513.59 R77.2@649.36,1485.84
NetJ11_7: 3V3.7@183.38,1159.96 R79.2 | length 616.5
  Top Layer w10: 3V3.7@183.38,1159.96 337.02,1313.59 337.02,1369.54 492.72,1525.23 567.72,1525.23 587.14,1505.81 587.14,1487.35 R79.2@588.65,1485.84
NetJ11_8: 3V3.8@183.38,1061.53 R81.2 | length 584.6
  Top Layer w10: 3V3.8@183.38,1061.53 442.72,1320.86 442.72,1430.59 497.96,1485.84 R81.2@527.93,1485.84
NetJ12_1: GND.12 T_IRQ.1 | length 717.1
  Top Layer w10: GND.12@1439.84,2698.82 1441.02,2700 v1(1500,2700)
  Bottom Layer w10: v1(1500,2700) 1435,2635 1435,2390 1615,2210 T_IRQ.1@1680,2210
NetJ12_2: GND.14 T_IRQ.2 | length 576.4
  Top Layer w10: GND.14@1459.61,2598.82 1486.18,2598.82 1520,2565 1520,2402.95 1627.72,2295.23 1694.77,2295.23 T_IRQ.2@1780,2210
NetJ12_3: GND.16 T_IRQ.3 | length 491.8
  Top Layer w10: GND.16@1620,2548.64 1620,2386.69 1676.46,2330.23 1767.72,2330.23 T_IRQ.3@1880,2217.95
NetJ12_4: GND.11 T_IRQ.4 | length 1155.8
  Top Layer w10: v1(1385,2750) GND.11@1458.43,2750
  Bottom Layer w10: v1(1385,2750) 1370,2735 1370,2405 1613.7,2161.3 1931.3,2161.3 T_IRQ.4@1980,2210
NetJ12_5: GND.13 T_IRQ.5 | length 984.4
  Top Layer w10: GND.13@1437.49,2651.17 GND.13@1439.84,2648.82
  Top Layer w15: GND.13@1439.84,2648.82 1440.43,2649.41 1499.41,2649.41 v1(1500,2650)
  Bottom Layer w10: v1(1500,2650) 1500,2380 1615,2265 2015,2265 2070,2210 T_IRQ.5@2080,2210
NetLS1_P: CLK.P R86.1 | length 264.2
  Top Layer w10: CLK.P@287.4,2496.5 326.5,2496.5 460,2630 R86.1@460,2666.31
NetQ1_1: Q1.1 R9.2 | length 81.3
  Top Layer w10: Q1.1@2461.72,2898.23 2465,2901.52 2465,2920 2475,2930 2495,2930 2495.23,2930.23 R9.2@2518.96,2930.23
NetQ2_1: Q2.1 R10.2 | length 79.5
  Top Layer w10: R10.2@2576.26,3000 2625,3000 2630,2995 2630,2974.49 Q2.1@2632.26,2972.23
NetQ3_3: Q3.3 R11.1 | length 316.8
  Top Layer w10: Q3.3@517.34,2252.42 512.66,2257.09 512.66,2285.18 527.72,2300.23 607.72,2300.23 719.74,2412.26 R11.1@719.74,2434.66
NetQ4_3: Q4.3 R28.1 | length 258.5
  Top Layer w10: Q4.3@650.2,2252.42 652.63,2254.85 652.63,2285.18 672.68,2305.23 707.72,2305.23 784.74,2382.26 R28.1@784.74,2434.66
NetQ5_3: Q5.3 R31.1 | length 209.9
  Top Layer w10: Q5.3@783.05,2252.42 783.05,2295.57 849.74,2362.26 R31.1@849.74,2434.66
NetQ6_3: Q6.3 R46.1 | length 182.7
  Top Layer w10: R46.1@914.74,2434.66 914.74,2253.59 Q6.3@915.91,2252.42
NetQ7_3: Q7.3 R51.1 | length 211.6
  Top Layer w10: R51.1@979.74,2434.66 979.74,2355.31 1048.77,2286.29 Q7.3@1048.77,2251.63
NetQ8_3: Q8.3 R64.1 | length 267.4
  Top Layer w10: R64.1@1044.74,2434.66 1044.74,2393.2 1122.72,2315.23 1167.72,2315.23 1184.17,2298.77 1184.17,2254.96 Q8.3@1181.63,2252.42
NetQ9_3: Q9.3 R71.1 | length 260.6
  Top Layer w10: R71.1@1174.74,2434.66 1174.74,2413.2 1222.72,2365.23 1257.72,2365.23 1314.48,2308.46 Q9.3@1314.48,2252.42
NetQ10_3: Q10.3 R82.1 | length 318
  Top Layer w10: R82.1@1239.74,2434.66 1239.74,2413.2 1257.72,2395.23 1342.72,2395.23 1447.34,2290.61 Q10.3@1447.34,2252.42
NetR5_1: DIO.13 R5.1 | length 315.9
  Top Layer w10: DIO.13@1096.59,2983.2 1096.59,3019.11 1167.72,3090.23 1297.72,3090.23 1313.29,3105.8 R5.1@1313.29,3133.2
NetR5_2: GND.28 R5.2 | length 1269
  Top Layer w10: v1(1255,3185) 1255.6,3184.4 1255.6,3133.8 R5.2@1256.2,3133.2 ; v1(1489.03,3217.48) 1489.18,3217.33 1489.18,3026.94 1708.96,2807.16 1832.84,2807.16 v1(1895,2745) ; v1(1980,2745) 1983.69,2745 1988.69,2750 2147.32,2750 GND.28@2148.5,2748.82
  Bottom Layer w10: v1(1255,3185) 1287.48,3217.48 v1(1489.03,3217.48) ; v1(1895,2745) v1(1980,2745)
NetR6_1: DIO.12 R6.1 | length 190
  Top Layer w10: DIO.12@1154.66,2925.13 1154.66,2988.13 1219.74,3053.2 R6.1@1254.74,3053.2
NetR6_2: GND.27 R6.2 | length 1372.6
  Top Layer w10: R6.2@1313.5,3053.2 1338.2,3053.2 1350,3065 1350,3224.43 1410.56,3284.99 1515.01,3284.99 1743.43,3056.57 1808.43,3056.57 1882.72,2982.28 1882.72,2802.28 1986.18,2698.82 GND.27@2148.5,2698.82
NetR11_2: DIO.38 R11.2 | length 278.7
  Top Layer w10: R11.2@719.74,2491.75 721.72,2493.72 721.72,2511.72 780.23,2570.23 857.72,2570.23 899.4,2611.91 899.4,2650.18 DIO.38@899.74,2650.53
NetR12_1: R12.1 U5.15 | length 376.2
  Top Layer w10: R12.1@2207.56,505 2207.56,700.07 2291.06,783.58 U5.15@2291.06,846.61
NetR13_1: MOSI_V.15 R13.1 | length 382.2
  Top Layer w10: MOSI_V.15@2544.05,1085.31 2544.05,1136.57 2639.7,1232.22 R13.1@2639.7,1427.91
NetR14_1: R14.1 U5.1 | length 140.3
  Top Layer w10: U5.1@2241.06,634.01 2241.06,580.39 2268.27,553.18 R14.1@2268.27,505
NetR15_1: MOSI_V.1 R15.1 | length 136.5
  Top Layer w10: R15.1@2578.27,1427.91 2578.27,1364.68 2594.05,1348.89 MOSI_V.1@2594.05,1297.91
NetR16_1: R16.1 U5.2 | length 144.7
  Top Layer w10: U5.2@2291.06,634.01 2291.06,571.89 2328.99,533.96 R16.1@2328.99,505
NetR17_1: MOSI_V.2 R17.1 | length 141.3
  Top Layer w10: R17.1@2516.84,1427.91 2516.84,1376.1 2544.05,1348.89 MOSI_V.2@2544.05,1297.91
NetR18_1: R18.1 U5.3 | length 149.2
  Top Layer w10: U5.3@2341.06,634.01 2341.06,571.89 2387.98,524.97 2387.98,506.72 R18.1@2389.7,505
NetR19_1: MOSI_V.3 R19.1 | length 146
  Top Layer w10: R19.1@2455.41,1427.91 2455.41,1387.53 2494.05,1348.89 MOSI_V.3@2494.05,1297.91
NetR20_1: R20.1 U5.4 | length 153.6
  Top Layer w10: U5.4@2391.06,634.01 2391.06,578.94 2445.03,524.97 2445.03,510.38 R20.1@2450.41,505
NetR21_1: MOSI_V.4 R21.1 | length 150.7
  Top Layer w10: R21.1@2393.99,1427.91 2393.99,1400.88 2442.58,1352.28 2442.58,1299.38 MOSI_V.4@2444.05,1297.91
NetR22_1: R22.1 U5.5 | length 172.7
  Top Layer w10: U5.5@2441.06,634.01 2441.06,571.89 2467.72,545.23 2492.72,545.23 2511.13,526.82 R22.1@2511.13,505
NetR23_1: MOSI_V.5 R23.1 | length 155.5
  Top Layer w10: R23.1@2332.56,1427.91 2332.56,1387.95 2394.05,1326.46 MOSI_V.5@2394.05,1297.91
NetR24_1: R24.1 U5.6 | length 174.2
  Top Layer w10: U5.6@2491.06,634.01 2491.06,586.88 2522.72,555.23 2542.72,555.23 2571.84,526.1 R24.1@2571.84,505
NetR25_1: MOSI_V.6 R25.1 | length 160.2
  Top Layer w10: R25.1@2271.13,1427.91 2275,1424.04 2275,1407.94 2341.82,1341.12 2341.82,1300.14 MOSI_V.6@2344.05,1297.91
NetR26_1: R26.1 U5.7 | length 187.4
  Top Layer w10: U5.7@2541.06,634.01 2542.53,632.55 2542.53,590.42 2567.72,565.23 2602.72,565.23 2632.56,535.39 R26.1@2632.56,505
NetR27_1: MOSI_V.7 R27.1 | length 182.5
  Top Layer w10: R27.1@2209.7,1427.91 2209.7,1398.25 2225.39,1382.56 2255.39,1382.56 2294.05,1343.89 MOSI_V.7@2294.05,1297.91
NetR28_2: DIO.39 R28.2 | length 243
  Top Layer w10: R28.2@784.74,2491.75 784.74,2518.2 809.74,2543.2 858.2,2543.2 919.08,2604.08 919.08,2650.18 DIO.39@919.43,2650.53
NetR29_1: R29.1 U7.15 | length 374.1
  Top Layer w10: R29.1@1642.56,505 1642.56,695.07 1721.06,773.58 U7.15@1721.06,846.61
NetR30_1: CS_V.15 R30.1 | length 375.8
  Top Layer w10: CS_V.15@1972.56,1087.91 1972.56,1155.07 2058.99,1241.5 R30.1@2058.99,1427.91
NetR31_2: DIO.40 R31.2 | length 195.8
  Top Layer w10: R31.2@849.74,2491.75 854.2,2496.2 854.2,2511.72 938.92,2596.44 938.92,2650.34 DIO.40@939.11,2650.53
NetR32_1: R32.1 U7.1 | length 142.4
  Top Layer w10: U7.1@1671.06,634.01 1671.06,563.94 1703.27,531.73 R32.1@1703.27,505
NetR33_1: CS_V.1 R33.1 | length 136.6
  Top Layer w10: R33.1@2000.41,1427.91 2000.41,1377.93 2022.56,1355.79 CS_V.1@2022.56,1300.51
NetR34_1: R34.1 U7.2 | length 146.8
  Top Layer w10: U7.2@1721.06,634.01 1721.06,573.94 1763.99,531.01 R34.1@1763.99,505
NetR35_1: CS_V.2 R35.1 | length 140.4
  Top Layer w10: R35.1@1941.13,1427.91 1941.13,1391.82 1972.56,1360.39 CS_V.2@1972.56,1300.51
NetR36_1: R36.1 U7.3 | length 151.2
  Top Layer w10: U7.3@1771.06,634.01 1771.06,578.94 1824.7,525.3 R36.1@1824.7,505
NetR37_1: CS_V.3 R37.1 | length 144.3
  Top Layer w10: R37.1@1881.84,1427.91 1881.84,1391.1 1922.56,1350.39 CS_V.3@1922.56,1300.51
NetR38_1: R38.1 U7.4 | length 155.7
  Top Layer w10: U7.4@1821.06,634.01 1821.06,583.94 1880.03,524.97 1880.03,510.38 R38.1@1885.41,505
NetR39_1: CS_V.4 R39.1 | length 148.1
  Top Layer w10: R39.1@1822.56,1427.91 1822.56,1402.09 1870.33,1354.32 1870.33,1302.74 CS_V.4@1872.56,1300.51
NetR40_1: R40.1 U7.5 | length 160.3
  Top Layer w10: U7.5@1871.06,634.01 1873.29,631.78 1873.29,591.71 1940.03,524.97 1940.03,510.83 1945.86,505 R40.1@1946.13,505
NetR41_1: CS_V.5 R41.1 | length 152
  Top Layer w10: R41.1@1763.27,1427.91 1763.27,1401.73 1820.99,1344.01 1820.99,1302.08 CS_V.5@1822.56,1300.51
NetR42_1: R42.1 U7.6 | length 182.1
  Top Layer w10: U7.6@1921.06,634.01 1921.06,583.94 1960,545 1990,545 2006.84,528.16 R42.1@2006.84,505
NetR43_1: CS_V.6 R43.1 | length 170.4
  Top Layer w10: R43.1@1703.99,1427.91 1703.99,1406.01 1725,1385 1750,1385 1772.56,1362.44 CS_V.6@1772.56,1300.51
NetR44_1: R44.1 U7.7 | length 204.1
  Top Layer w10: U7.7@1971.06,634.01 1971.06,588.94 1990,570 2050,570 2067.56,552.44 R44.1@2067.56,505
NetR45_1: CS_V.7 R45.1 | length 177.5
  Top Layer w10: R45.1@1643.99,1427.91 1643.99,1396.01 1675,1365 1705,1365 1722.56,1347.44 CS_V.7@1722.56,1300.51
NetR46_2: DIO.41 R46.2 | length 177
  Top Layer w10: R46.2@914.74,2491.75 914.74,2518.2 958.8,2562.26 DIO.41@958.8,2650.53
NetR47_1: R47.1 U9.15 | length 376.2
  Top Layer w10: R47.1@1087.56,505 1087.56,695.07 1171.06,778.58 U9.15@1171.06,846.61
NetR48_1: R48.1 U10.15 | length 379.4
  Top Layer w10: U10.15@1422.56,1087.91 1422.56,1140.07 1517.56,1235.07 R48.1@1517.56,1427.91
NetR49_1: R49.1 U9.1 | length 140
  Top Layer w10: U9.1@1121.06,634.01 1121.06,561.88 1147.56,535.39 R49.1@1147.56,505
NetR50_1: R50.1 U10.1 | length 134.2
  Top Layer w10: R50.1@1456.13,1427.91 1456.13,1366.82 1472.56,1350.39 U10.1@1472.56,1300.51
NetR51_2: DIO.42 R51.2 | length 159.3
  Top Layer w10: DIO.42@978.48,2650.53 978.48,2493.01 R51.2@979.74,2491.75
NetR52_1: R52.1 U9.2 | length 144.1
  Top Layer w10: U9.2@1171.06,634.01 1171.06,566.89 1207.56,530.39 R52.1@1207.56,505
NetR53_1: R53.1 U10.2 | length 138.9
  Top Layer w10: R53.1@1394.7,1427.91 1394.7,1383.25 1422.56,1355.39 U10.2@1422.56,1300.51
NetR54_1: R54.1 U9.3 | length 148.3
  Top Layer w10: U9.3@1221.06,634.01 1221.06,571.88 1267.56,525.39 R54.1@1267.56,505
NetR55_1: R55.1 U10.3 | length 143.7
  Top Layer w10: R55.1@1333.27,1427.91 1333.27,1394.67 1372.56,1355.39 U10.3@1372.56,1300.51
NetR56_1: R56.1 U9.4 | length 152.4
  Top Layer w10: U9.4@1271.06,634.01 1271.06,581.89 1327.56,525.39 R56.1@1327.56,505
NetR57_1: R57.1 U10.4 | length 148.4
  Top Layer w10: R57.1@1271.84,1427.91 1271.84,1402.09 1320.33,1353.6 1320.33,1302.74 U10.4@1322.56,1300.51
NetR58_1: R58.1 U9.5 | length 156.6
  Top Layer w10: U9.5@1321.06,634.01 1322.53,632.55 1322.53,590.42 1387.56,525.39 R58.1@1387.56,505
NetR59_1: R59.1 U10.5 | length 153.1
  Top Layer w10: R59.1@1210.41,1427.91 1210.41,1404.59 1270.99,1344.01 1270.99,1302.08 U10.5@1272.56,1300.51
NetR60_1: R60.1 U9.6 | length 172.4
  Top Layer w10: U9.6@1371.06,634.01 1371.06,586.89 1412.72,545.23 1432.72,545.23 1447.56,530.39 R60.1@1447.56,505
NetR61_1: R61.1 U10.6 | length 172.5
  Top Layer w10: R61.1@1148.99,1427.91 1148.99,1401.01 1177.56,1372.44 1202.56,1372.44 1222.56,1352.44 U10.6@1222.56,1300.51
NetR62_1: R62.1 U9.7 | length 182.4
  Top Layer w10: U9.7@1421.06,634.01 1421.06,586.89 1437.72,570.23 1467.72,570.23 1507.56,530.39 R62.1@1507.56,505
NetR63_1: R63.1 U10.7 | length 172.3
  Top Layer w10: R63.1@1087.56,1427.91 1087.56,1397.44 1125,1360 1141.61,1360 1172.56,1329.05 U10.7@1172.56,1300.51
NetR64_2: DIO.43 R64.2 | length 178.1
  Top Layer w10: DIO.43@998.17,2650.53 998.17,2564.78 1044.74,2518.2 R64.2@1044.74,2491.75
NetR65_1: R65.1 U11.15 | length 374.4
  Top Layer w10: R65.1@532.56,500 532.56,690.07 617.56,775.07 U11.15@617.56,839.21
NetR66_1: R66.1 RST_TFT.15 | length 382.5
  Top Layer w10: RST_TFT.15@867.56,1081.61 867.56,1130.07 952.93,1215.45 R66.1@952.93,1428.76
NetR67_1: R67.1 U11.1 | length 137.9
  Top Layer w10: U11.1@567.56,626.61 567.56,572.27 594.73,545.09 R67.1@594.73,500
NetR68_1: R68.1 RST_TFT.1 | length 145
  Top Layer w10: R68.1@892.22,1428.76 892.22,1375.73 917.56,1350.39 RST_TFT.1@917.56,1294.21
NetR69_1: R69.1 U11.2 | length 142.3
  Top Layer w10: U11.2@617.56,626.61 617.56,565.39 655.42,527.53 R69.1@655.42,500
NetR70_1: R70.1 RST_TFT.2 | length 149.5
  Top Layer w10: R70.1@831.5,1428.76 831.5,1386.44 867.56,1350.39 RST_TFT.2@867.56,1294.21
NetR71_2: DIO.45 R71.2 | length 243.2
  Top Layer w10: DIO.45@1037.54,2649.83 1037.54,2602.18 1101.52,2538.2 1149.86,2538.2 1174.74,2513.32 R71.2@1174.74,2491.75
NetR72_1: R72.1 U11.3 | length 147
  Top Layer w10: U11.3@667.56,626.61 667.56,570.39 716.84,521.1 R72.1@716.84,500
NetR73_1: R73.1 RST_TFT.3 | length 153.9
  Top Layer w10: R73.1@770.79,1428.76 770.79,1397.8 817.56,1351.03 RST_TFT.3@817.56,1294.21
NetR74_1: R74.1 U11.4 | length 151.8
  Top Layer w10: U11.4@717.56,626.61 717.56,575.39 772.98,519.97 772.98,505.29 R74.1@778.27,500
NetR75_1: R75.1 RST_TFT.4 | length 158.4
  Top Layer w10: R75.1@710.07,1428.76 710.07,1397.87 765.61,1342.33 765.61,1296.16 RST_TFT.4@767.56,1294.21
NetR76_1: R76.1 U11.5 | length 166.4
  Top Layer w10: U11.5@767.56,626.61 767.56,573.4 807.72,533.25 824.7,533.25 837.98,519.97 837.98,501.72 R76.1@839.7,500
NetR77_1: R77.1 RST_TFT.5 | length 162.8
  Top Layer w10: R77.1@649.36,1428.76 649.36,1408.59 717.56,1340.39 RST_TFT.5@717.56,1294.21
NetR78_1: R78.1 U11.6 | length 178.8
  Top Layer w10: U11.6@817.56,626.61 817.56,570.39 832.72,555.23 862.72,555.23 897.98,519.97 897.98,503.15 R78.1@901.13,500
NetR79_1: R79.1 RST_TFT.6 | length 181.9
  Top Layer w10: R79.1@588.65,1428.76 588.65,1404.3 617.56,1375.39 642.56,1375.39 667.56,1350.39 RST_TFT.6@667.56,1294.21
NetR80_1: R80.1 U11.7 | length 189.4
  Top Layer w10: U11.7@867.56,626.61 867.56,580.39 902.35,545.59 942.35,545.59 962.56,525.39 R80.1@962.56,500
NetR81_1: R81.1 RST_TFT.7 | length 199.3
  Top Layer w10: R81.1@527.93,1428.76 527.93,1383.84 556.54,1355.23 603.67,1355.23 617.56,1341.35 RST_TFT.7@617.56,1294.21
NetR82_2: DIO.46 R82.2 | length 288.5
  Top Layer w10: DIO.46@1057.22,2650.53 1057.57,2650.18 1057.57,2607.43 1106.41,2558.59 1198.72,2558.59 1239.74,2517.57 R82.2@1239.74,2491.75
NetU1_14: CS_V.12 DIO.14 MOSI_V.12 RST_TFT.12 U5.12 U7.12 U9.12 U10.12 U11.12 | length 5523.3
  Top Layer w10: RST_TFT.12@717.56,1081.61 717.56,960.55 ; U11.12@767.56,839.21 767.56,885.39 717.56,935.39 717.56,960.55 ; DIO.14@1076.91,2983.2 1076.91,3038.1 1098.8,3060 v1(1100,3060) ; U10.12@1272.56,1087.91 1272.56,960.61 1272.49,960.55 ; U9.12@1321.06,846.61 1321.06,960.55 ; CS_V.12@1822.56,1087.91 1822.56,960.55 ; U7.12@1871.06,846.61 1871.06,960.55 ; v1(2392.72,1180.23) 2393.38,1179.56 2393.38,1085.98 MOSI_V.12@2394.05,1085.31 2394.05,961.57 2393.03,960.55 ; U5.12@2441.06,846.61 2441.06,937.09 2417.61,960.55 2393.03,960.55 ; 717.56,960.55 1272.49,960.55 ; 1272.49,960.55 1321.06,960.55 ; 1321.06,960.55 1822.56,960.55 ; 1822.56,960.55 1871.06,960.55 ; 1871.06,960.55 2393.03,960.55
  Bottom Layer w10: v1(1100,3060) 1100,2830.09 1085,2815.09 1085,2435 1515,2005 1515,1685 1950,1250 2322.95,1250 v1(2392.72,1180.23)
NetU1_15: CS_V.11 DIO.15 MOSI_V.11 RST_TFT.11 U5.11 U7.11 U9.11 U10.11 U11.11 | length 7720.5
  Top Layer w10: RST_TFT.11@667.56,1081.61 667.56,1022.04 667.72,1021.89 v1(667.72,990.23) ; U11.11@817.56,839.21 818.78,840.43 818.78,933.78 v1(820,935) ; DIO.15@1057.22,2983.2 1057.47,2983.45 1057.47,3057.89 v1(1059.81,3060.23) ; U10.11@1222.56,1087.91 1222.64,1087.83 1222.64,990.31 v1(1222.72,990.23) ; v1(1367.72,935.23) 1369.39,933.56 1369.39,848.29 U9.11@1371.06,846.61 ; CS_V.11@1772.56,1087.91 1772.64,1087.83 1772.64,990.31 v1(1772.72,990.23) ; U7.11@1921.06,846.61 1921.89,847.44 1921.89,934.4 v1(1922.72,935.23) ; v1(2342.72,990.23) 2343.38,990.9 2343.38,1084.64 MOSI_V.11@2344.05,1085.31 ; v1(2487.72,935.23) 2489.39,933.56 2489.39,848.29 U5.11@2491.06,846.61
  Bottom Layer w10: v1(667.72,990.23) 820,990.23 ; v1(820,935) 820,990.23 ; v1(1059.81,3060.23) 1057.72,3062.33 1057.72,3082.72 1070,3095 1114.69,3095 1125,3084.69 1125,2829.81 1105.32,2810.13 1105.32,2464.69 1545,2025 1545,1790 1959.28,1375.72 2619.28,1375.72 2720,1275 2720,1020 2635.23,935.23 v1(2487.72,935.23) ; v1(1222.72,990.23) 820,990.23
  Bottom Layer w15: v1(820,935) 820.12,935.12 1367.6,935.12 v1(1367.72,935.23) v1(1922.72,935.23) v1(2487.72,935.23) ; v1(1222.72,990.23) v1(1772.72,990.23) v1(2342.72,990.23)
NetU1_17: DIO.17 MOSI_V.14 | length 3015.1
  Top Layer w10: v1(985,3040) 987.61,3037.39 1002.61,3037.39 1017.51,3022.49 1017.51,2983.55 DIO.17@1017.85,2983.2 ; v1(2492.72,1150.23) 2493.38,1149.56 2493.38,1085.98 MOSI_V.14@2494.05,1085.31
  Bottom Layer w10: v1(985,3040) 985,2480 1490,1975 1490,1545 1884.77,1150.23 v1(2492.72,1150.23)
NetU2_34: GND.34 U3.2 | length 627.4
  Top Layer w10: GND.34@2161.92,3048.82 2191.18,3048.82 2200,3040 2200,2920 2245,2875 2245,2750 2340,2655 2415,2655 2437.45,2632.55 2437.45,2600.22 U3.2@2440,2597.68
NetU2_35: GND.35 U3.3 | length 706.2
  Top Layer w10: GND.35@2168.27,3098.82 2196.18,3098.82 2220,3075 2220,2960 2265,2915 2265,2769.48 2353.64,2680.84 2448.3,2680.84 2490,2639.14 U3.3@2490,2597.68
NetU3_5: MOSI_H.1 U3.5 | length 511.9
  Top Layer w10: U3.5@2590,2597.68 2590,2655 2625,2690 2700,2690 2795,2785 2795,2930 2807.4,2942.4 MOSI_H.1@2840.59,2942.4
NetU3_6: MOSI_H.3 U3.6 | length 518.2
  Top Layer w10: U3.6@2640,2597.68 2640,2560 2655,2545 2745,2545 2800,2600 2800,2727.11 2820,2747.11 2820,2855.13 2821.77,2856.9 2821.77,2860.98 2828.39,2867.6 MOSI_H.3@2840.59,2867.6
NetU5_14: U5.14 U7.9 | length 445.9
  Top Layer w10: U7.9@2021.06,846.61 2021.06,898.58 2047.72,925.23 2314.26,925.23 2341.06,898.43 U5.14@2341.06,846.61
NetU6_9: CS_V.14 MOSI_V.9 | length 444.1
  Top Layer w10: CS_V.14@1922.56,1087.91 1922.56,1035.39 1947.72,1010.23 2217.72,1010.23 2244.05,1036.57 MOSI_V.9@2244.05,1085.31